# Altium PCB Studio_Clock_hv1.01_PCB_240215a.PcbDoc (part 5 of 5)
Units mm, origin at the board's own origin, x right, y up, seen from the top; angles counter-clockwise.
Board outline 360 x 60 mm, 4 copper layers (TOP, PWR, GND, BOTTOM), stack 0.547 mm thick; 257 components, 289 nets, 969 pads, 664 vias.
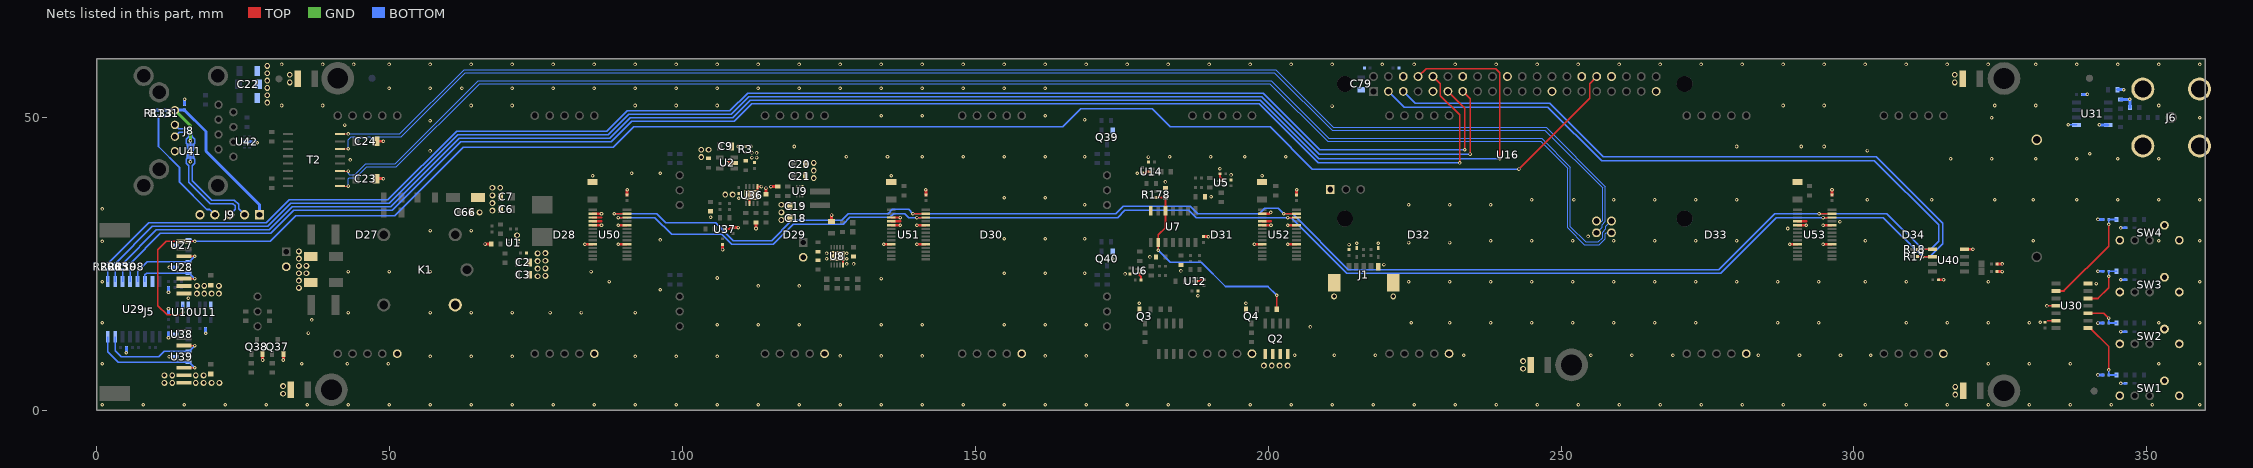
[diagram p5: the nets of this part, all layers, seen from the top]

## Via types
v1: diameter 0.6, hole 0.3, TOP to BOTTOM, 539 vias
v2: diameter 1, hole 0.6, TOP to BOTTOM, 125 vias

## Nets (pads, with @x,y where several pads share a name; then routed paths per layer and width w, separated by ;. In a path a pad name is that pad's centre, name@x,y a point inside that pad or via, vN(x,y) a via of type N, cw(c..) or ccw(c..) an arc to the next point about the centre after c; other vN are vias at no path point) (continued)
PWM_RED: R41.2 R77.2 R178.1 U7.5 U7.9 | length 37
  TOP w0.3: R178.1@180.85,36.35 R77.2@182.45,36.35 182.48,36.32 U7.5@182.48,34.075 182.48,31.23 181.21,29.96 U7.9@181.21,28.625 181.225,28.61 v1(181.225,27.35) ; R41.2@201.45,17.25 v1(201.45,19.65)
  BOTTOM w0.3: v1(181.225,27.35) 183.3,25.275 188.575,25.275 192.7,21.15 199.95,21.15 v1(201.45,19.65)
RED_CTRL_IN: J5.1 U10.2 U16.32 U27.1 | length 284.8
  TOP w0.25: v1(14.7,16.75) 14.3,16.35 12,16.35 10.45,17.9 10.45,27.45 11.85,28.85 J5.1@14.9,28.85 v1(16.75,28.85) ; v1(242.8,41.2) 254.85,53.25 254.85,55.78 U16.32@256.07,57
  BOTTOM w0.25: v1(14.7,16.75) U10.2@14.7,18 ; U27.1@15.75,29.15 16.05,29.15 16.35,28.85 v1(16.75,28.85) 29.65,28.85 34.007,33.207 50.857,33.207 62.557,44.907 88.207,44.907 91.7,48.4 164.95,48.4 168.007,51.457 180.193,51.457 183.243,48.407 200.319,48.407 207.527,41.2 v1(242.8,41.2)
RED_SEL: D27.1 D28.1 D29.1 D30.1 D31.1 D32.1 D33.1 D34.1 Q2.5 Q2.6 Q2.7 Q2.8
  other v2: 199.25,7.65 200.6,7.65 201.95,7.65 203.3,7.65
RS232_RX_IN: J5.3 U28.1 U29.13 | length 14.4
  TOP w0.25: J5.3@14.9,26.31 v1(16.75,26.31)
  BOTTOM w0.25: U29.13@6.96,22 6.96,23.71 8.6,25.35 U28.1@15.65,25.35 15.79,25.35 v1(16.75,26.31)
RS232_RX_OUT: J5.14 U29.8 U39.2 | length 20.4
  TOP w0.25: J5.14@14.9,7.26 v1(16.75,7.26)
  BOTTOM w0.25: U29.8@1.88,12.55 1.88,10.02 3.7,8.2 U39.2@15.65,8.2 15.81,8.2 v1(16.75,7.26)
RS232_TX_IN: J5.6 U28.2 U29.14 | length 12.1
  TOP w0.25: J5.6@14.9,22.5 v1(16.75,22.5)
  BOTTOM w0.25: U29.14@8.23,22 8.23,23.18 8.5,23.45 U28.2@15.65,23.45 15.8,23.45 v1(16.75,22.5)
RS232_TX_OUT: J5.11 U29.7 U39.1 | length 19
  TOP w0.25: J5.11@14.9,11.07 v1(16.75,11.07)
  BOTTOM w0.25: U29.7@3.15,12.55 3.15,10.2 4.2,9.15 10.55,9.15 11.5,10.1 U39.1@15.65,10.1 15.78,10.1 v1(16.75,11.07)
RX_DN_DNP: 
RX_DP_DNP: 
RX_N: T2.8 U16.46 | length 237.3
  TOP w0.2: T2.8@41.558,47.195 42.945,47.195 v1(42.95,47.2)
  BOTTOM w0.2: v1(42.95,47.2) 51.75,47.2 62.7,58.15 201.25,58.15 211.1,48.3 247.457,48.3 257.575,38.182 257.575,32.268 256.985,31.678 256.985,31.265 U16.46@256.05,30.33
RX_P: T2.6 U16.44 | length 237.3
  TOP w0.2: T2.6@41.558,44.655 42.945,44.655 v1(42.95,44.65)
  BOTTOM w0.2: v1(42.95,44.65) 42.95,46.2 43.45,46.7 44.05,46.7 44.35,46.4 44.7,46.4 45,46.7 45.35,46.7 45.65,46.4 46,46.4 46.3,46.7 46.65,46.7 46.95,46.4 47.3,46.4 47.6,46.7 51.957,46.7 62.907,57.65 201.043,57.65 210.893,47.8 247.25,47.8 257.075,37.975 257.075,32.475 256.93,32.33 U16.44@256.05,32.33
SCL_RTC: R17.1 U16.5 U40.6 U50.26 U51.26 U52.26 U53.26 | length 356.6
  TOP w0.25: v1(89.026,32.925) U50.26@90.538,32.925 ; v1(140.026,32.925) U51.26@141.538,32.925 ; v1(203.326,32.925) U52.26@204.838,32.925 ; v1(294.726,32.925) U53.26@296.238,32.925 ; R17.1@310.85,26.25 v1(311.7,26.25) 311.715,26.235 U40.6@313.438,26.235
  BOTTOM w0.25: v1(89.026,32.925) 95.306,32.925 98.131,30.1 106.681,30.1 108.431,28.35 115.495,28.35 118.945,31.8 127.445,31.8 128.595,32.95 135.4,32.95 136.05,33.6 137.95,33.6 138.625,32.925 v1(140.026,32.925) 174.306,32.925 175.531,34.15 186.445,34.15 187.67,32.925 v1(203.326,32.925) 203.894,32.925 213.419,23.4 277.219,23.4 286.744,32.925 v1(294.726,32.925) 305.025,32.925 v1(311.7,26.25) 312.95,26.25 315.15,28.45 315.15,31.94 303.79,43.3 257.19,43.3 248.04,52.45 225.06,52.45 U16.5@223.05,54.46
SDA_RTC: R18.1 U16.3 U40.5 U50.27 U51.27 U52.27 U53.27 | length 360.8
  TOP w0.25: v1(88.35,33.575) U50.27@90.538,33.575 ; v1(139.35,33.575) U51.27@141.538,33.575 ; v1(202.65,33.575) U52.27@204.838,33.575 ; v1(294.05,33.575) U53.27@296.238,33.575 ; R18.1@310.85,27.5 v1(311.7,27.5) 311.705,27.505 U40.5@313.438,27.505
  BOTTOM w0.25: v1(88.35,33.575) 95.575,33.575 97.15,32 105.7,32 108.7,29 115.226,29 118.676,32.45 127.176,32.45 128.326,33.6 135.1,33.6 135.8,34.3 138.625,34.3 v1(139.35,33.575) 174.001,33.575 175.251,34.825 186.725,34.825 187.95,33.6 198.5,33.6 199.4,34.5 201.725,34.5 v1(202.65,33.575) 204.163,33.575 213.688,24.05 276.95,24.05 286.475,33.575 v1(294.05,33.575) 305.625,33.575 v1(311.7,27.5) 313.1,27.5 314.45,28.85 314.45,31.65 303.5,42.6 256.9,42.6 247.75,51.75 223.22,51.75 U16.3@220.51,54.46
SGND: B1.1 C2.1 C3.1 C4.2 C6.1 C7.1 C8.1 C9.1 C10.2 C11.2 C12.1 C13.1 C14.1 C15.1 C16.1 C17.1 C18.1 C19.1 C20.1 C21.1 C22.2 C23.1 C24.1 C25.1 C26.1 C27.1 C28.1 C29.1 C30.1 C31.1 C32.1 C33.1 C64.1 C65.2 C66.1 C67.2 C68.1 C69.1 C72.1 C73.1 C74.1 C75.1 C76.1 C77.1 C78.2 C79.1 C80.2 C81.2 C84.1 C85.1 C93.2 C94.2 C95.1 C96.1 C97.1 D9.2 D10.2 D11.2 D12.2 D20.1 D21.1 D22.2 D23.2 D24.2 D25.2 D26.2 J1.5 J1.6 J1.7 J2.2 J5.7 J5.8 J5.15 J5.16 J6.2 J8.A4 J9.5 J11.2 K1.5 Q3.2 Q4.2 Q37.2 Q38.2 Q39.2 Q40.2 R2.1 R3.1 R6.1 R7.2 R8.2 R21.1 R45.1 R51.1 R61.2 R62.1 R63.2 R71.1 R77.1 R92.1 R93.1 R94.1 R95.1 R96.1 R133.1 R156.2 R157.2 R161.1 R187.1 R189.1 R191.1 R199.1 R201.2 SW1.0 SW1.1 SW2.0 SW2.1 SW3.0 SW3.1 SW4.0 SW4.1 U1.3 U2.2 U5.2 U6.2 U7.7 U8.5 U8.11 U9.4 U10.3 U11.3 U12.2 U14.2 U16.6 U16.9 U16.14 U16.20 U16.25 U16.30 U16.34 U16.39 U16.41 U27.3 U28.3 U29.15 U30.7 U30.11 U30.13 U31.4 U31.5 U36.2 U36.5 U36.9 U37.2 U38.3 U39.3 U40.4 U41.2 U42.3 U42.8 U50.2 U50.3 U50.4 U50.5 U50.10 U50.19 U50.24 U51.3 U51.4 U51.5 U51.10 U51.19 U51.24 U52.2 U52.4 U52.5 U52.10 U52.19 U52.24 U53.4 U53.5 U53.10 U53.19 U53.24 | length 95.7
  TOP w0.25: v1(332.95,17.84) 332.96,17.85 U30.11@334.475,17.85 ; 332.96,15.31 U30.13@334.475,15.31
  TOP w0.3: v1(127.2,25.9) 127.4,25.7 U8.5@127.4,24.85
  TOP w0.35: U37.2@107.537,30.95 107.95,30.95 108.2,31.2 C84.1@108.65,31.2 ; U36.2@111.475,35.3 111.475,36.425 v1(111.8,36.75) ; v1(112.65,37.2) 112.775,37.325 U36.5@112.775,38.2 v1(113.475,38.2) ; U6.2@178.05,23.463 178.05,23.05 178.3,22.8 C14.1@178.3,22.25 ; C29.1@178.5,40.5 179.05,40.5 179.3,40.75 U14.2@179.713,40.75 ; U12.2@187.837,22.05 188.25,22.05 188.5,22.3 C25.1@189.05,22.3 ; C12.1@191.75,40.4 191.75,39.85 192,39.6 U5.2@192,39.187
  TOP w0.4: v1(83.35,28.375) U50.10@84.662,28.375 ; U50.5@84.662,31.625 v1(86.174,31.625) ; U50.4@84.662,32.275 86.174,32.275 ; U50.3@84.662,32.925 86.174,32.925 ; U50.2@84.662,33.575 v1(86.174,33.575) ; v1(89.026,28.375) U50.19@90.538,28.375 ; v1(89.026,31.625) U50.24@90.538,31.625 ; v1(134.35,28.375) U51.10@135.662,28.375 ; U51.5@135.662,31.625 v1(137.174,31.625) ; U51.4@135.662,32.275 137.174,32.275 ; U51.3@135.662,32.925 v1(137.174,32.925) ; v1(140.026,28.375) U51.19@141.538,28.375 ; v1(140.026,31.625) U51.24@141.538,31.625 ; v1(197.65,28.375) U52.10@198.962,28.375 ; U52.5@198.962,31.625 v1(200.474,31.625) ; U52.4@198.962,32.275 200.474,32.275 ; U52.2@198.962,33.575 200.225,33.575 v1(200.45,33.8) ; v1(203.326,28.375) U52.19@204.838,28.375 ; v1(203.326,31.625) U52.24@204.838,31.625 ; v1(289.05,28.375) U53.10@290.362,28.375 ; U53.5@290.362,31.625 v1(291.874,31.625) ; U53.4@290.362,32.275 291.874,32.275 ; v1(294.726,28.375) U53.19@296.238,28.375 ; v1(294.726,31.625) U53.24@296.238,31.625
  TOP w0.5: v1(28.3,8.6) Q38.2@28.3,9.65 ; v1(31.85,8.6) Q37.2@31.85,9.65 ; C23.1@47.65,39.55 v1(48.95,39.55) ; C24.1@47.65,45.95 v1(48.95,45.95) ; v1(66.3,28.4) R2.1@67.35,28.4 ; C65.2@90.55,36.8 v1(90.55,37.65) ; v1(106.85,27.45) C85.1@106.85,28.3 ; C84.1@108.65,31.2 v1(109.5,31.2) ; v1(112.55,31.05) R157.2@112.55,32.1 ; R156.2@114.25,36.9 v1(114.25,37.95) ; v1(115.1,38.2) R63.2@116.25,38.2 ; R62.1@125.45,32.25 v1(125.45,33.35) ; C78.2@141.55,36.8 v1(141.55,37.65) ; C64.1@188.95,29.65 v1(189.8,29.65) ; C80.2@204.85,36.8 v1(204.85,37.65) ; C81.2@296.25,36.8 v1(296.25,37.65) ; C28.1@314.45,22.3 v1(315.3,22.3) ; U40.4@318.862,27.505 320.295,27.505 v1(320.3,27.5) ; C31.1@324.45,23.7 v1(325.3,23.7) ; C32.1@324.45,25 v1(325.3,25)
  TOP w0.6: v1(107.6,42.25) U2.2@108.85,42.25
  BOTTOM w0.3: v1(16,42.45) U41.2@16,43.445 ; v1(336.6,48.75) 336.605,48.745 U31.5@338,48.745
  BOTTOM w0.4: U42.3@25.233,45.85 U42.8@26.067,45.85 27.25,45.85 v1(27.4,45.7) ; v1(345.55,4.6) D9.2@346.4,4.6 ; v1(345.55,13.45) D10.2@346.4,13.45 ; v1(345.55,22.3) D11.2@346.4,22.3 ; v1(345.55,31.15) D12.2@346.4,31.15
  BOTTOM w0.5: v1(5.05,9.85) C69.1@5.05,10.7 ; v1(9.7,51.25) R133.1@10.55,51.25 ; v1(12.25,12.4) C68.1@12.25,13.25 ; C10.2@12.25,16.5 v1(12.25,17.35) ; v1(12.25,20.15) C67.2@12.25,21 ; v1(12.4,24.4) U28.3@13.45,24.4 ; C95.1@15,52.25 v1(15,53.1) ; v1(18.6,13.15) C11.2@18.6,14 ; C77.1@339,53.95 v1(339.85,53.95) ; v1(341.65,6.05) C72.1@342.5,6.05 ; v1(341.65,14.9) C73.1@342.5,14.9 ; v1(341.65,23.75) C74.1@342.5,23.75 ; v1(341.65,32.6) C75.1@342.5,32.6 ; v1(341.9,48.75) 341.905,48.745 U31.4@343.4,48.745 ; R201.2@345,54.75 v1(346.05,54.75) ; R199.1@345.5,53.1 v1(347.1,53.1) R6.1@347.1,51.7
  other v1: 0.95,0.95 7.95,0.95 14.95,0.95 21.95,0.95 28.95,0.95 35.95,0.95 42.95,0.95 49.95,0.95 56.95,0.95 63.95,0.95 70.95,0.95 77.95,0.95 84.95,0.95 91.95,0.95 98.95,0.95 105.95,0.95 112.95,0.95 119.95,0.95 126.95,0.95 133.95,0.95 140.95,0.95 147.95,0.95 154.95,0.95 161.95,0.95 168.95,0.95 175.95,0.95 182.95,0.95 189.95,0.95 196.95,0.95 203.95,0.95 210.95,0.95 217.95,0.95 224.95,0.95 231.95,0.95 238.95,0.95 245.95,0.95 252.95,0.95 259.95,0.95 266.95,0.95 273.95,0.95 280.95,0.95 287.95,0.95 294.95,0.95 301.95,0.95 308.95,0.95 315.95,0.95 322.95,0.95 329.95,0.95 336.95,0.95 343.95,0.95 350.95,0.95 359.05,0.95 0.95,7.95 35,7.95 42.8,7.95 49.8,7.95 322.95,7.95 329.95,7.95 336.95,7.95 352.05,7.95 359.05,7.95 12.35,9.15 56.95,9.2 63.95,9.2 70.95,9.2 91.95,9.2 98.95,9.2 105.95,9.2 126.95,9.3 133.95,9.3 140.95,9.3 161.95,9.3 168.95,9.3 204.5,9.4 211.3,9.4 218.3,9.4 233.4,9.4 255.1,9.4 262.1,9.4 269.1,9.4 283.7,9.4 290.7,9.4 297.7,9.4 302.85,9.4 36.15,13.2 207.2,14.25 105.95,14.6 112.95,14.6 119.95,14.6 133.95,14.6 140.95,14.6 154.95,14.6 161.95,14.6 168.95,14.6 0.95,14.95 224.4,14.95 230.95,14.95 237.95,14.95 244.95,14.95 251.95,14.95 258.95,14.95 265.95,14.95 272.95,14.95 286.95,14.95 293.95,14.95 308.95,14.95 315.95,14.95 322.95,14.95 329.95,14.95 352.05,14.95 359.05,14.95 331.8,15.05 36.7,15.45 42.95,16.7 56.95,16.7 63.95,16.7 70.95,16.7 77.4,16.7 82.75,16.7 91.95,16.7 178,18.3 196.2,18.3 15.65,19.15 188,19.55 96.2,20.6 112.95,21.25 119.95,21.25 341.35,21.65 0.95,21.95 223.95,21.95 230.95,21.95 237.95,21.95 244.95,21.95 251.95,21.95 258.95,21.95 265.95,21.95 272.95,21.95 279.95,21.95 286.95,21.95 293.95,21.95 301.95,21.95 308.95,21.95 322.95,21.95 359.05,21.95 87.5,22 133.95,22.5 105.95,22.6 175.55,23.3 154.95,23.4 161.95,23.4 168.65,23.4 42.95,23.7 49.95,23.7 56.95,23.7 84.4,23.7 185.1,23.8 219.75,24.9 128.05,25 129.2,25 124.6,25.9 125.6,25.9 128.05,25.9 173.45,25.9 179.8,26.2 126.4,26.35 124.6,26.8 125.6,26.8 127.2,26.8 128.05,26.8 12.85,28.2 213.8,28.3 215.1,28.55 218.8,28.55 223.95,28.65 230.95,28.65 0.95,28.85 237.95,28.95 244.95,28.95 251.95,28.95 258.95,28.95 265.95,28.95 272.95,28.95 279.95,28.95 301.95,28.95 330.6,28.95 352.05,28.95 359.05,28.95 96.2,29.1 154.95,29.3 161.95,29.3 168.65,29.3 254.6,29.7 56.95,30.7 63.95,30.7 288.7,31.05 297.6,32.2 104.8,32.95 0.95,34.4 168.65,35.1 223.95,35.1 230.95,35.1 237.95,35.1 244.95,35.95 252.2,35.95 258.95,35.95 265.95,35.95 272.95,35.95 279.95,35.95 302.3,35.95 313.25,35.95 324.05,35.95 330.6,35.95 338.05,35.95 345.05,35.95 352.05,35.95 359.05,35.95 109.6,36.2 110.95,36.3 112.65,36.3 154.95,36.3 161.95,36.3 190.25,36.45 110.95,37.2 182.45,39 84.65,40.05 135.65,40.05 198.95,40.05 193.65,40.2 91.3,40.5 96.2,40.5 177.65,40.5 191.75,41.25 43.3,42.75 316.5,42.95 323.5,42.95 331.05,42.95 338.05,42.95 345.05,42.95 352.05,42.95 111.85,43.15 112.65,43.15 179.55,43.25 128,43.3 135,43.3 140.95,43.3 147.95,43.3 154.95,43.3 161.95,43.3 168.65,43.3 183.15,43.3 190.15,43.3 196,43.3 203,43.3 340.25,43.8 111.85,43.95 112.65,43.95 56.9,44.3 302.3,44.35 109.55,45.05 111.65,45.05 119.1,45.05 279.95,45.05 291,45.05 294.9,45.05 173.45,46.6 42.35,48.7 56.9,49.45 168.65,49.6 323.5,49.95 359.05,49.95 133.95,50.3 140.95,50.3 161.95,50.3 210.9,51.95 31.55,52.05 38.55,52.05 63.9,52.05 70.9,52.05 91.9,52.05 98.9,52.05 105.9,52.05 287.9,52.05 294.9,52.05 324.05,52.05 331.05,52.05 352.05,52.05 49.9,55 56.9,55 62.35,55 70.9,55 77.9,55 84.9,55 91.9,55 98.9,55 105.9,55 112.9,55 119.9,55 126.9,55 133.9,55 140.9,55 147.9,55 154.9,55 161.9,55 31.55,59.05 38.55,59.05 43.85,59.05 49.9,59.05 56.9,59.05 63.9,59.05 70.9,59.05 77.9,59.05 84.9,59.05 91.9,59.05 98.9,59.05 105.9,59.05 112.9,59.05 119.9,59.05 126.9,59.05 133.9,59.05 140.9,59.05 147.9,59.05 154.9,59.05 161.9,59.05 168.9,59.05 175.9,59.05 182.9,59.05 189.9,59.05 196.9,59.05 203.9,59.05 210.9,59.05 219.45,59.05 224.9,59.05 231.9,59.05 238.9,59.05 245.9,59.05 252.9,59.05 259.9,59.05 266.9,59.05 273.9,59.05 280.9,59.05 287.9,59.05 294.9,59.05 301.9,59.05 308.9,59.05 315.9,59.05 322.9,59.05 331.05,59.05 338.05,59.05 345.05,59.05 352.05,59.05 359.05,59.05
  other v2: 317.3,2.7 31.8,2.85 317.3,4 31.8,4.15 11.55,4.7 12.9,4.7 16.9,4.7 18.25,4.7 19.6,4.7 20.95,4.7 11.55,5.97 12.9,5.97 16.9,5.97 18.25,5.97 243.5,7.1 243.5,8.4 211.25,19.45 221.35,19.45 17.1,19.95 18.35,19.95 19.6,19.95 20.85,19.95 34.5,20.9 17.1,21.25 18.35,21.25 20.85,21.25 34.5,22.15 75.25,22.9 76.6,22.95 34.5,23.4 35.8,23.4 75.25,24.2 76.6,24.25 34.5,24.65 35.8,24.65 75.25,25.5 76.6,25.55 34.5,25.9 75.25,26.8 76.6,26.85 34.5,27.15 71.75,29.9 116.9,32.5 65.35,33.8 116.9,33.8 67.55,34.1 116.9,35.1 67.55,35.4 67.55,36.7 107.3,36.85 108.55,36.85 67.55,38 68.9,38 122.4,39.65 122.4,40.95 122.4,42.25 103.2,43.25 103.2,44.5 104.45,44.5 29.1,52.55 29.1,53.8 29.1,55.05 32.95,56 317.2,56 29.1,56.3 32.95,57.3 317.2,57.3 29.1,57.55 29.1,58.8
SS: 
SW0: C72.2 R139.2 U30.1 | length 11
  TOP w0.3: U30.1@339.925,14.04 340.36,14.04 343.5,10.9 v1(343.5,6.9)
  BOTTOM w0.3: v1(343.5,6.9) C72.2@343.5,6.05 R139.2@344.8,6.05
SW1: C73.2 R140.2 U30.3 | length 6.1
  TOP w0.3: U30.3@339.925,16.58 342.67,16.58 v1(343.5,15.75)
  BOTTOM w0.3: v1(343.5,15.75) C73.2@343.5,14.9 R140.2@344.8,14.9
SW2: C74.2 R141.2 U30.5 | length 8.4
  TOP w0.3: U30.5@339.925,19.12 341.67,19.12 343.5,20.95 v1(343.5,22.9)
  BOTTOM w0.3: v1(343.5,22.9) C74.2@343.5,23.75 R141.2@344.8,23.75
SW3: C75.2 R142.2 U30.9 | length 18
  TOP w0.3: U30.9@334.475,20.39 335.84,20.39 343.5,28.05 v1(343.5,31.75)
  BOTTOM w0.3: v1(343.5,31.75) C75.2@343.5,32.6 R142.2@344.8,32.6
SYNC: 
TX_DN_DNP: 
TX_DP_DNP: 
TX_N: T2.3 U16.45 | length 243.8
  TOP w0.2: T2.3@41.558,40.845 42.945,40.845 v1(42.95,40.85)
  BOTTOM w0.2: v1(42.95,40.85) 42.95,40.45 43.15,40.25 44.05,40.25 45.9,42.1 50.963,42.1 65.163,56.3 200.484,56.3 210.334,46.45 246.691,46.45 251.6,41.541 251.6,31.35 254.2,28.75 256.343,28.75 257.075,29.482 257.075,30.392 257.665,30.982 257.665,31.395 U16.45@258.6,32.33
TX_P: T2.1 U16.47 | length 243.8
  TOP w0.2: T2.1@41.558,38.305 42.945,38.305 v1(42.95,38.3)
  BOTTOM w0.2: v1(42.95,38.3) 42.95,39.55 43.15,39.75 44.257,39.75 46.107,41.6 51.17,41.6 65.37,55.8 200.277,55.8 210.127,45.95 246.484,45.95 251.1,41.334 251.1,31.143 253.993,28.25 256.55,28.25 257.575,29.275 257.575,30.185 257.72,30.33 U16.47@258.6,30.33
UART1_RX_IN: R198.2 U16.10 | length 259.1
  TOP w0.25: U16.10@228.13,57 229.4,55.73 229.4,53.75 232.7,50.45 v1(232.7,42.25)
  BOTTOM w0.25: R198.2@5.7,25.05 10.85,30.2 29.696,30.2 33.646,34.15 50.467,34.15 62.167,45.85 87.817,45.85 91.309,49.343 108.843,49.343 111.85,52.35 198.427,52.35 208.527,42.25 v1(232.7,42.25)
UART1_RX_IN_1: R198.1 U29.12 | length 2.1
  BOTTOM w0.25: U29.12@5.69,22 5.69,24.04 R198.1@5.7,24.05
UART1_TX_IN: R130.1 U16.8 | length 280.2
  TOP w0.25: U16.8@225.59,57 226.94,58.35 238.85,58.35 239.55,57.65 v1(239.55,43)
  BOTTOM w0.25: R130.1@4.45,25.05 10.2,30.8 29.447,30.8 33.397,34.75 50.218,34.75 61.918,46.45 87.568,46.45 91.061,49.943 108.594,49.943 111.601,52.95 198.675,52.95 208.625,43 v1(239.55,43)
UART1_TX_IN_1: R130.2 U29.11 | length 2.1
  BOTTOM w0.25: U29.11@4.42,22 4.42,24.02 R130.2@4.45,24.05
UART2_RX_OUT: R206.2 U16.11 | length 258.9
  TOP w0.25: U16.11@230.67,54.46 233.55,51.58 v1(233.55,44.5)
  BOTTOM w0.25: R206.2@1.9,25.05 8.85,32 28.95,32 32.9,35.95 49.721,35.95 61.421,47.65 87.071,47.65 90.564,51.143 108.097,51.143 111.104,54.15 199.172,54.15 208.822,44.5 v1(233.55,44.5)
UART2_RX_OUT_1: R206.1 U29.9 | length 2.1
  BOTTOM w0.25: U29.9@1.88,22 1.88,24.03 R206.1@1.9,24.05
UART2_TX_OUT: R205.2 U16.13 | length 258.4
  TOP w0.25: U16.13@233.21,54.46 234.45,53.22 v1(234.45,43.75)
  BOTTOM w0.25: R205.2@3.15,25.05 9.5,31.4 29.199,31.4 33.149,35.35 49.969,35.35 61.669,47.05 87.319,47.05 90.812,50.543 108.346,50.543 111.353,53.55 198.924,53.55 208.724,43.75 v1(234.45,43.75)
UART2_TX_OUT_1: R205.1 U29.10 | length 2.1
  BOTTOM w0.25: U29.10@3.15,22 R205.1@3.15,24.05
USB_D_N: J8.A2 J9.2 U41.1 U41.6 | length 24
  BOTTOM w0.25: J8.A2@13.35,48.74 14.04,48.05 15.649,48.05 16.3,47.399 16.3,46.7 16.7,46.3 16.7,45.6 16.5,45.4 U41.6@16.5,45.055 U41.1@16.5,43.445 16.5,43.1 16.7,42.9 16.7,42.2 16.3,41.8 16.3,39.2 19.6,35.9 23.5,35.9 24.25,35.15 24.25,34.39 J9.2@25.24,33.4
USB_D_P: J8.A3 J9.3 U41.3 U41.4 | length 23
  BOTTOM w0.25: J8.A3@13.35,46.74 14.06,47.45 15.4,47.45 15.7,47.15 15.7,46.7 15.3,46.3 15.3,45.6 15.5,45.4 U41.4@15.5,45.055 U41.3@15.5,43.445 15.5,43.1 15.3,42.9 15.3,42.2 15.7,41.8 15.7,38.951 19.351,35.3 23.251,35.3 23.65,34.901 23.65,34.35 J9.3@22.7,33.4
USB_ID: J9.4 R131.1 R133.2 | length 22.2
  BOTTOM w0.3: R131.1@11.65,50.25 R133.2@10.55,50.25 10.55,45.05 14.15,41.45 14.15,38.95 18.8,34.3 19.26,34.3 J9.4@20.16,33.4
USB_PWR: C95.2 J8.A1 J9.1 R131.2 U41.5 | length 33.8
  GND w0.5: J8.A1@13.35,51.24 16,48.59 v1(16,46.05)
  BOTTOM w0.3: U41.5@16,45.055 v1(16,46.05)
  BOTTOM w0.5: R131.2@11.65,51.25 13.34,51.25 J8.A1@13.35,51.24 13.36,51.25 C95.2@15,51.25 18.65,47.6 18.65,44.25 27.78,35.12 J9.1@27.78,33.4
VCC_AUX: 
VCP: 
VOB: 
pads on no net: C2. C3. C6. C7. C9. C18. C19. C20. C21. C22. C23. C24. C66. C79. J5.17 J5.18 R3. R13. R14. R15. R16. R17. R18. R127. R128. R130. R131. R133. R171. R172. R173. R174. R175. R176. R177. R178. R198. R205. R206. SW1.3 SW2.3 SW3.3 SW4.3 T2.4 T2.5 T2.12 T2.13 U10.1 U11.1 U16. U16.1 U16.15 U16.16 U16.17 U16.18 U16.19 U16.21 U16.22 U16.23 U16.27 U16.36 U30.10 U30.12 U31.6 U31.7 U40.7 Z2.1 Z4.1 Z6.1 Z8.1 Z10.1 Z12.1
copper on no net:
  other v1: 290.35,40.05

## Polygon pours and split planes (outlines as drawn)
SGND on PWR "NONET_L02_P-001" (solid, remove dead copper, pour order 12): 0.6,0.6 0.6,34.55 1.2,35.15 22.5,35.15 23.75,36.4 23.75,40.4 22.45,41.7 13.35,41.7 8.4,46.65 8.4,51.8 8.65,52.05 12.45,52.05 14.15,53.75 16.3,53.75 17.15,52.9 19.25,52.9 19.8,53.45 22.15,53.45 24.6,51 24.6,50.35 26,48.95 26.95,48.95 28.75,47.15 28.75,37.25 29.8,36.2 41.85,36.2 41.85,49.3 29.6,49.3 26.5,52.4 26.5,58.95 26.95,59.4 359.4,59.4 359.4,0.6
PGND on PWR "NONET_L02_P-001" (solid, remove dead copper, pour order 8): 25.4,50.75 25.2,50.95 25.2,51.15 22.35,54 19.55,54 19,53.45 17.35,53.45 16.5,54.3 13.9,54.3 12.45,52.85 8.7,52.85 7.9,52.05 7.9,46.4 13.1,41.2 22.2,41.2 23.25,40.15 23.25,36.7 22.2,35.65 1.2,35.65 0.6,36.25 0.6,58.8 1.2,59.4 25.1,59.4 25.55,58.95 25.55,52.45 26.5,51.5 26.5,50.95 26.3,50.75 25.85,50.75
+5V on PWR "NONET_L02_P-001" (solid, remove dead copper, pour order 6): 207.3,57.9 207.85,58.45 221,58.45 221.35,58.1 221.35,56.05 220.95,55.65 217.45,55.65 214.4,52.6 207.85,52.6 207.3,53.15
+5V_IN on PWR "NONET_L02_P-001" (solid, remove dead copper, pour order 5): 103.7,38.95 102.95,39.7 102.95,36.95 104.3,35.6 104.9,35.6 104.05,36.45 104.05,37.15 104.65,37.75 108.8,37.75 109.05,38 109.05,38.7 108.8,38.95
+5V_IN on PWR "NONET_L02_P-001" (solid, remove dead copper, pour order 4): 79.25,43.3 74.45,38.5 70.75,38.5 70.5,38.25 70.5,33.85 70.75,33.6 73.8,33.6 79.25,39.05
+5V_IN on PWR "NONET_L02_P-001" (solid, remove dead copper, pour order 3): 74.4,34.2 81.4,41.2 100.1,41.2 100.75,40.55 100.75,35.3 104.1,31.95 111.1,31.95 111.7,31.35 111.7,23.5 113.3,21.9 123.3,21.9 123.65,22.25 123.65,23.95 123.25,24.35 117.15,24.35 115.8,25.7 115.8,32.95 113.15,35.6 104.9,35.6 103.3,37.2 103.3,41.8 101.05,44.05 80,44.05 72.275,36.325
+3V3 on PWR "NONET_L02_P-001" (solid, remove dead copper, pour order 2): 307.45,44.65 307.45,25.2 320.25,12.4 336.8,12.4 336.8,13.85 336.3,14.35 321.4,14.35 309.65,26.1 309.65,44.65 311.2,46.2 305.9,46.2
+3V3 on PWR "NONET_L02_P-001" (solid, remove dead copper, pour order 1): 106.5,39.7 106.95,40.15 106.95,42.6 108.4,44.05 108.4,45 109.25,45.85 321.75,45.85 337.4,30.2 337.4,25.15 338.2,24.35 339.8,24.35 340.45,25 340.45,42.45 338.95,43.95 329.45,43.95 324.95,48.45 107.25,48.45 105.55,46.75 105.55,44.3 103.95,42.7 103.95,39.95 104.2,39.7 104.75,39.7
+5V on PWR "NONET_L02_P-001" (solid, remove dead copper, pour order 0): 108.25,39.55 108.5,39.3 115.5,39.3 120.15,34.65 146.55,34.65 148.3,32.9 148.3,21.65 146.55,19.9 104.3,19.9 102.25,21.95 98.7,21.95 97.35,20.6 97.35,14.95 98.7,13.6 101,13.6 103.15,15.75 169.65,15.75 171.75,13.65 173.3,13.65 173.6,13.95 206.05,13.95 206.3,14.2 206.3,16 206.05,16.25 181.2,16.25 175,22.45 154.55,22.45 153,24 153,37.15 150.05,40.1 120.05,40.1 117.95,42.2 108.85,42.2 108.25,41.6
SGND on BOTTOM "NONET_L02_P-001" (solid, remove dead copper, pour order 14): 0.6,0.6 0.6,34.55 1.2,35.15 22.5,35.15 23.75,36.4 23.75,40.4 22.45,41.7 13.35,41.7 8.4,46.65 8.4,51.8 8.65,52.05 12.45,52.05 14.15,53.75 16.3,53.75 17.15,52.9 19.25,52.9 19.8,53.45 22.15,53.45 24.6,51 24.6,50.35 26,48.95 26.95,48.95 28.75,47.15 28.75,37.25 29.8,36.2 41.85,36.2 41.85,49.3 29.6,49.3 26.5,52.4 26.5,58.95 26.95,59.4 359.4,59.4 359.4,0.6
PGND on BOTTOM "NONET_L02_P-001" (solid, remove dead copper, pour order 7): 25.2,49.65 25.2,51.15 22.35,54 19.55,54 19,53.45 17.35,53.45 16.5,54.3 13.9,54.3 12.45,52.85 8.7,52.85 7.9,52.05 7.9,46.4 12.4,41.9 12.4,36.65 11.4,35.65 1.2,35.65 0.6,36.25 0.6,58.8 1.2,59.4 25.1,59.4 25.55,58.95 25.55,52.45 26.5,51.5 26.5,49.95 26.2,49.65 26,49.65
SGND on TOP "NONET_L02_P-001" (solid, remove dead copper, pour order 11): 0.6,0.6 0.6,34.55 1.2,35.15 22.5,35.15 23.75,36.4 23.75,40.4 22.45,41.7 13.35,41.7 8.4,46.65 8.4,51.8 8.65,52.05 12.45,52.05 14.15,53.75 16.3,53.75 17.15,52.9 19.25,52.9 19.8,53.45 22.15,53.45 24.6,51 24.6,50.35 26,48.95 26.95,48.95 28.75,47.15 28.75,37.25 29.8,36.2 41.85,36.2 41.85,49.3 29.6,49.3 26.5,52.4 26.5,58.95 26.95,59.4 359.4,59.4 359.4,0.6
PGND on TOP "NONET_L02_P-001" (solid, remove dead copper, pour order 9): 25.4,50.75 25.2,50.95 25.2,51.15 22.35,54 19.55,54 19,53.45 17.35,53.45 16.5,54.3 13.9,54.3 12.45,52.85 8.7,52.85 7.9,52.05 7.9,46.4 13.1,41.2 22.2,41.2 23.25,40.15 23.25,36.7 22.2,35.65 1.2,35.65 0.6,36.25 0.6,58.8 1.2,59.4 25.1,59.4 25.55,58.95 25.55,52.45 26.5,51.5 26.5,50.95 26.3,50.75 25.85,50.75
SGND on GND "NONET_L02_P-001" (solid, remove dead copper, pour order 15): 11.5,34.9 12.95,36.35 12.95,42.15 12.7,42.4 21.75,42.4 22.45,41.7 19.45,41.7 18.15,40.4 18.15,37.65 20.65,35.15 22.5,35.15 22.5,34.9
SGND on GND "NONET_L02_P-001" (solid, remove dead copper, pour order 13): 0.6,0.6 0.6,34.55 2.25,36.2 23,36.2 23.75,36.95 23.75,40.4 22.45,41.7 13.35,41.7 8.4,46.65 8.4,51.8 8.65,52.05 12.45,52.05 14.15,53.75 16.3,53.75 17.15,52.9 19.25,52.9 19.8,53.45 22.15,53.45 24.6,51 24.6,50.35 26,48.95 26.95,48.95 28.75,47.15 28.75,37.25 29.8,36.2 41.85,36.2 41.85,49.3 29.6,49.3 26.5,52.4 26.5,58.95 26.95,59.4 359.4,59.4 359.4,0.6
PGND on GND "NONET_L02_P-001" (solid, remove dead copper, pour order 10): 25.2,49.65 25.2,51.15 22.35,54 19.55,54 19,53.45 17.35,53.45 16.5,54.3 13.9,54.3 12.45,52.85 8.7,52.85 7.9,52.05 7.9,46.4 12.4,41.9 12.4,36.65 11.4,35.65 1.2,35.65 0.6,36.25 0.6,58.8 1.2,59.4 25.1,59.4 25.55,58.95 25.55,52.45 26.5,51.5 26.5,49.95 26.2,49.65 26,49.65

## Keep-outs
Keep-Out Layer:
  the board outline again, w1

## Other copper
TOP:
  rectangle net SGND: 35.75,20.15 37.3,27.55
  rectangle net NetR95_2: 321,1.95 323.85,4.75
  rectangle net NetR93_2: 247.2,6.35 250.05,9.15
  rectangle net NetR94_2: 35.5,2.1 38.35,4.9
  rectangle net NetR96_2: 36.65,55.25 39.5,58.05
  rectangle net NetR92_2: 320.9,55.25 323.75,58.05
  rectangle net NetR59_2: 116.25,36.3 119.65,36.8
  pour cut-out: 320.75,25.9 322.75,25.9 322.75,22.8 320.75,22.8
  pour cut-out: 43.536,8.631 49.189,8.631 49.803,9.245 49.803,10.08 52.964,13.241 48.146,13.241
  pour cut-out: 77.191,8.631 82.844,8.631 83.458,9.245 83.458,10.208 84.95,11.7 79.45,11.7 77.191,9.441
  pour cut-out: 116.496,8.631 122.149,8.631 122.763,9.245 122.763,10.08 126.074,13.391 124.774,14.691 122.294,14.691 116.496,8.893
  pour cut-out: 150.151,8.631 155.507,8.631 155.507,9.293 151.75,13.05 148.95,13.05 148.6,12.7 150.151,11.149
  pour cut-out: 189.462,8.631 194.818,8.631 194.818,18.368 194.85,18.4 194.01,18.4 189.462,13.851
  pour cut-out: 223.117,8.631 228.473,8.631 222.313,14.791 220.259,14.791 219.609,14.141 219.609,13.975 223.117,10.467
  pour cut-out: 273.852,8.631 279.505,8.631 280.119,9.245 280.119,10.08 283.53,13.491 282.23,14.791 279.75,14.791 273.852,8.893
  pour cut-out: 312.863,8.631 312.863,9.542 307.605,14.8 304.35,14.8 304.35,12.95 306.596,10.704 306.596,9.245 307.21,8.631
  pour cut-out: 304.705,49.271 315.7,49.271 316.314,49.885 316.314,50.755 315.7,51.369 314.865,51.369 312.075,54.159 309.593,54.159
  pour cut-out: 282.01,49.271 271.015,49.271 270.401,49.885 270.401,50.755 271.015,51.369 271.85,51.369 274.64,54.159 277.122,54.159
  pour cut-out: 217.25,47.45 219.071,49.271 231.379,49.271 232.3,48.35 232.3,50.45 229.3,53.45 219.5,53.45 217.25,51.2
  pour cut-out: 196.079,49.271 196.8,48.55 196.8,51.58 194.272,54.109 190.2,54.109 187.46,51.369 186.625,51.369 186.011,50.755 186.011,49.885 186.625,49.271
  pour cut-out: 147.349,49.271 158.344,49.271 158.958,49.885 158.958,50.755 158.344,51.369 157.509,51.369 154.769,54.109 152.187,54.109
  pour cut-out: 127.54,49.861 125.279,49.861 124.689,49.271 113.659,49.271 113.045,49.885 113.045,50.755 113.659,51.369 114.494,51.369 117.234,54.109 123.292,54.109
  pour cut-out: 87.44,49.861 85.974,49.861 85.384,49.271 74.354,49.271 73.74,49.885 73.74,50.755 74.354,51.369 75.189,51.369 77.929,54.109 83.192,54.109
  pour cut-out: 42.171,49.271 41.85,48.95 39.6,48.95 39.25,49.3 40.085,50.135 40.085,50.755 40.699,51.369 41.534,51.369 44.274,54.109 50.891,54.109 53.15,51.85 53.15,49.9 52.358,49.9 51.729,49.271
  pour cut-out: 37.3,32.056 39.65,32.056 39.65,15.944 37.3,15.944
  pour cut-out: 8.4,46.65 13.35,41.7 22.45,41.7 23.75,40.4 23.75,36.4 22.5,35.15 28.75,35.15 29.8,36.2 29.8,46.1 22.45,53.45 19.8,53.45 19.25,52.9 17.15,52.9 16.3,53.75 14.15,53.75 12.45,52.05 8.65,52.05 8.4,51.8
  region net +5V: 148.35,39.35 148.85,39.85 153.25,39.85 171.2,57.8 207.95,57.8 208.5,57.25 208.5,54.6 207.95,54.05 204.45,54.05 203.1,55.4 172.75,55.4 154.15,36.8 148.85,36.8 148.35,37.3 148.35,37.75
  region net +5V_IN: 111,37.775 107.075,37.775 106.8,38.05 106.8,38.7 107.05,38.95 110.675,38.95 111,38.625
  region net +3V3: 106.9,41.75 104.05,41.75 103.9,41.6 103.9,40 104.2,39.7 106.7,39.7 107,40 107,41.65
  region net RED_SEL: 203.8,7.4 203.55,7.15 196.68,7.15 196.43,7.4 196.43,10.3 196.68,10.55 203.55,10.55 203.8,10.3
  region net GREEN_SEL: 180.8,7.4 181.05,7.15 187.6,7.15 187.85,7.4 187.85,10.3 187.6,10.55 181.05,10.55 180.8,10.3 180.8,9.55
  region net +5V: 200.45,16 200.7,16.25 206.05,16.25 206.3,16 206.3,13.5 206.05,13.25 200.7,13.25 200.45,13.5
  region net +5V: 182.25,16 182.5,16.25 187.85,16.25 188.1,16 188.1,13.5 187.85,13.25 182.5,13.25 182.25,13.5
  region net NetF3_1: 37.3,28.25 33.55,28.25 33.1,27.8 33.1,26.3 30.95,26.3 30.55,26.7 30.55,29.3 33,31.75 37.3,31.75
  region net +5V_IN: 123.5,24.35 124.425,25.275 126.05,25.275 126.05,23.8 125.1,22.85 125.1,21.9 121.65,21.9 121.4,22.15 121.4,24.1 121.65,24.35
  region net NetC17_2: 119.85,36.8 119.85,27.9 123.8,27.9 124.275,27.425 126.05,27.425 126.05,28.55 125.35,29.25 124.75,29.25 122.65,31.35 122.65,33.45 123.2,34 125.15,34 125.15,35.8 121.65,35.8 120.65,36.8
  region net NetL2_1: 120.15,38.5 120.15,37.9 120.3,37.75 120.9,37.75 121.1,37.95 125.15,37.95 125.15,36.6 121.35,36.6 120.9,37.05 120.1,37.05 119.85,37.3 119.85,38.5
  region net +5V_BP: 119.65,38 117.5,38 117.5,38.75 116.95,39.3 112.8,39.3 112.3,38.8 112.3,37.775 111.95,37.775 111.95,41.45 112.05,41.55 115.8,41.55 116.9,42.65 119.45,42.65 119.65,42.45
  region net SGND: 108.225,42.575 109.65,42.575 110.425,43.35 111.2,43.35 111.35,43.5 111.35,44.1 111.5,44.25 112.8,44.25 112.95,44.1 112.95,42.2 112.8,42.05 110.1,42.05 109.975,41.925 108.225,41.925
  region net +5V: 111.65,37.775 111.65,41.15 111.15,41.65 108.225,41.65 108.225,39.7 108.625,39.3 110.8,39.3 111.3,38.8 111.3,37.775
  region net +5V_IN: 77.85,33.6 70.5,33.6 70.5,38.25 70.75,38.5 77.3,38.5 77.85,37.95
  region net NetC1_1: 71.75,28.75 72.35,28.75 72.85,29.25 72.75,29.35 72.75,31.1 77.85,31.1 77.85,28.1 77.45,27.7 73.1,27.7 72.35,28.45 71.75,28.45
  region net SGND: 72.25,28.95 72.25,30.15 72,30.4 71.5,30.4 71.25,30.15 71.25,29.15 71.45,28.95
  region net +12V: 71.55,28.25 71.4,28.1 71.4,27.05 69.9,25.55 62.2,25.55 61.45,24.8 61.45,23.25 62.2,22.5 72.3,22.5 72.3,25.9 72.6,26.2 72.6,27.9 72.25,28.25
  region net +12V_Ext: 39.65,31.75 39.65,25.4 50.4,25.4 51.2,26.2 51.2,31 50.4,31.8 48.4,31.8 44.95,28.35 42.75,28.35 42.25,28.85 42.25,31.75
  region net NetD20_2: 39.65,16.25 39.65,22.6 50.4,22.6 51.2,21.8 51.2,17 50.4,16.2 48.4,16.2 44.95,19.65 42.75,19.65 42.25,19.15 42.25,16.25
  region net +12V_Q: 37.3,19.75 37.3,16.25 33.7,16.25 33.45,16.5 33.45,19.5 33.7,19.75
  region net +12V_Q: 13.625,10.125 17.565,10.125 18.35,10.91 23.85,10.91 24.1,10.66 24.1,7.66 23.85,7.41 18.3,7.41 17.5,8.21 13.625,8.21
  region net +12V_Q: 13.625,25.375 17.575,25.375 18.35,26.15 23.85,26.15 24.1,25.9 24.1,22.9 23.85,22.65 18.3,22.65 17.5,23.45 13.625,23.45
PWR:
  pour cut-out: 320.75,25.9 322.75,25.9 322.75,22.8 320.75,22.8
  pour cut-out: 8.4,46.65 13.35,41.7 22.45,41.7 23.75,40.4 23.75,36.4 22.5,35.15 28.75,35.15 29.8,36.2 29.8,46.1 22.45,53.45 19.8,53.45 19.25,52.9 17.15,52.9 16.3,53.75 14.15,53.75 12.45,52.05 8.65,52.05 8.4,51.8
  pour cut-out: 213.95,57.7 215.1,56.55 215.1,54.85 214,53.75 212.25,53.75 211.1,54.9 211.1,56.55 212.25,57.7
  region net GREEN_SEL: 221.126,8.65 221.476,9 221.476,10.65 221.976,11.15 218.926,11.15 219.426,10.65 219.426,9 219.776,8.65 220.376,8.65
  region net GREEN_SEL: 271.861,8.65 272.211,9 272.211,10.65 272.711,11.15 269.661,11.15 270.161,10.65 270.161,9 270.511,8.65 271.111,8.65
  region net GREEN_SEL: 148.16,8.65 148.51,9 148.51,10.65 149.01,11.15 145.96,11.15 146.46,10.65 146.46,9 146.81,8.65 147.41,8.65
  region net +12V_Q: 25.05,20.1 26.4,21.45 28.1,21.45 33.3,16.25 35.45,16.25 35.7,16.5 35.7,19.5 35.45,19.75 34.2,19.75 27.8,26.15 22.1,26.15 21.85,25.9 21.85,7.65 22.1,7.4 24.8,7.4 25.05,7.65
  region net GREEN_SEL: 75.2,8.65 75.55,9 75.55,10.65 76.05,11.15 73,11.15 73.5,10.65 73.5,9 73.85,8.65 74.45,8.65
  region net GREEN_SEL: 187.85,10.3 188.55,11 305.9,11 305.9,12.15 304.75,13.3 174.3,13.3 173.85,12.85 171.2,12.85 170.75,13.3 102.05,13.3 101.6,12.85 97.6,12.85 97.15,13.3 41.1,13.3 39.55,11.75 39.55,9.05 39.95,8.65 41.55,8.65 41.95,9.05 41.95,10.35 42.6,11 95.75,11 96.25,10.5 103.15,10.5 103.65,11 168.4,11 172.25,7.15 187.15,7.15 187.85,7.85
  region net RED_SEL: 84.539,10.48 84.189,10.13 84.189,8.48 83.559,7.85 86.869,7.85 86.239,8.48 86.239,10.13 85.889,10.48 85.289,10.48
  region net RED_SEL: 157.499,10.48 157.149,10.13 157.149,8.48 156.519,7.85 159.829,7.85 159.199,8.48 159.199,10.13 158.849,10.48 158.249,10.48
  region net RED_SEL: 230.465,10.48 230.115,10.13 230.115,8.48 229.485,7.85 232.795,7.85 232.165,8.48 232.165,10.13 231.815,10.48 231.215,10.48
  region net RED_SEL: 123.844,10.48 123.494,10.13 123.494,8.48 122.864,7.85 126.174,7.85 125.544,8.48 125.544,10.13 125.194,10.48 124.594,10.48
  region net GREEN_SEL: 305.55,8.65 305.9,9 305.9,11.15 303.316,11.15 303.816,10.65 303.816,9 304.166,8.65 304.766,8.65
  region net RED_SEL: 281.2,10.48 280.85,10.13 280.85,8.48 280.22,7.85 283.53,7.85 282.9,8.48 282.9,10.13 282.55,10.48 281.95,10.48
  region net RED_SEL: 52.85,10.45 53.3,10 53.3,8.4 53.65,8.05 170.25,8.05 171.9,6.4 195.85,6.4 196.4,6.95 196.4,10 196.85,10.45 201.7,10.45 204.1,8.05 238.05,8.05 241.6,4.5 256.4,4.5 259.95,8.05 314.1,8.05 314.45,8.4 314.45,10.1 314.8,10.45 316.4,10.45 316.75,10.1 316.75,7.35 315.1,5.7 261.5,5.7 257.9,2.1 240.1,2.1 238.35,3.85 52.7,3.85 50.5,6.05 50.5,10 50.95,10.45 51.2,10.45
  region net GREEN_SEL: 114.505,8.65 114.855,9 114.855,10.65 115.355,11.15 112.305,11.15 112.805,10.65 112.805,9 113.155,8.65 113.755,8.65
  region net +12V_Q: 35.45,19.75 35.7,19.5 35.7,16.5 35.45,16.25 33.7,16.25 33.45,16.5 33.45,19.5 33.7,19.75
  region net +12V_Q: 23.85,26.15 24.1,25.9 24.1,22.9 23.85,22.65 22.1,22.65 21.85,22.9 21.85,25.9 22.1,26.15
  region net +12V_Q: 23.85,10.91 24.1,10.66 24.1,7.66 23.85,7.41 22.1,7.41 21.85,7.66 21.85,10.66 22.1,10.91
GND:
  pour cut-out: 320.75,25.9 322.75,25.9 322.75,22.8 320.75,22.8
  pour cut-out: 0.6,34.55 1.2,35.15 11.75,35.15 12.95,36.35 12.1,36.35 11.4,35.65 1.2,35.65 0.6,35.05
BOTTOM:
  rectangle net PGND: 25.2,49.65 26.1,51.15
  region net PGND: 24.65,59.15 24.1,59.15 24.1,52.104 24.65,52.104
  rectangle net SGND: 27.15,52 27.7,59.15
  rectangle net SGND: 222.05,57.85 222.419,58.45
  pour cut-out: 8.4,46.65 13.35,41.7 22.45,41.7 23.75,40.4 23.75,36.4 22.5,35.15 28.75,35.15 29.8,36.2 29.8,46.1 22.45,53.45 19.8,53.45 19.25,52.9 17.15,52.9 16.3,53.75 14.15,53.75 12.45,52.05 8.65,52.05 8.4,51.8
  region net +5V: 220.85,56.25 221.3,56.7 221.3,57.45 221.55,57.7 221.55,58.7 220.65,58.7 219.75,57.8 219.75,56.65 220.15,56.25
  region net +5V: 215.25,56.3 215.3,56.25 218.3,56.25 218.75,56.7 218.75,58.25 218.3,58.7 217.15,58.7 217.15,57.8 216.6,57.25 215.25,57.25
  region net +3V3: 106,40.7 106.25,40.45 106.25,39.95 106,39.7 104.2,39.7 103.95,39.95 103.95,40.45 104.2,40.7
  region net +5V: 111.4,40.3 111.65,40.05 111.65,39.55 111.4,39.3 108.5,39.3 108.25,39.55 108.25,40.05 108.5,40.3
  region net +12V_Q: 23.85,10.91 24.1,10.66 24.1,7.66 23.85,7.41 22.1,7.41 21.85,7.66 21.85,10.66 22.1,10.91
  region net +12V_Q: 23.85,26.15 24.1,25.9 24.1,22.9 23.85,22.65 22.1,22.65 21.85,22.9 21.85,25.9 22.1,26.15

## Silkscreen, mask and mechanical layers (free items; w line width, h text height)
Top Overlay:
  lines w0.15: 66.4,32.2 66.4,31.6 67.05,30.95 ; 68.2,32.8 68.55,32.8 68.95,32.4 ; 104.8,32.5 105.7,32.5 ; 107.15,37.55 109.15,37.55 ; 121.1,34.1 121.5,33.7 ; 121.1,38.4 121.3,38.6 122.6,38.6 ; 121.7,23.2 122.7,23.2 122.9,23.4 ; 121.8,40.3 122.6,40.3 ; 176.8,25.4 177.1,25.1 177.1,24.7 177.2,24.6 ; 180.8,41.7 180.9,41.8 181.5,41.8 181.6,41.9 ; 188.3,22.9 188.4,23 189.1,23 189.2,23.1 ; 192.9,38.2 193,38.1 193,37.6 193.2,37.4
  text "Studio_Clock_hv1.01" at 99.3,3.507 h4
Bottom Overlay:
  lines w0.15: 211,57.7 214.7,57.7 215,57.4
DESIGN_OUTLINE:
  the board outline again, w0.1
Drill Drawing:
  lines w0.381: 55.29,67.001 146.351,67.001 ; 55.29,124.151 146.351,124.151 ; 69.283,63.191 69.283,127.961 ; 84.519,63.191 84.519,127.961 ; 113.72,63.191 113.72,127.961 ; 126.569,63.191 126.569,127.961 ; 55.29,63.191 146.351,63.191 146.351,127.961 55.29,127.961 55.29,63.191
  text "Symbol" at 57.576,125.294 h1.83
  text "Count" at 70.426,125.294 h1.83
  text "Hole Size" at 85.662,125.294 h1.83
  text "Plated" at 114.863,125.294 h1.83
  text "Hole Type" at 127.712,125.294 h1.83
  text "539" at 70.426,121.484 h1.52
  text "0.300mm (11.81mil)" at 85.662,121.484 h1.52
  text "PTH" at 114.863,121.484 h1.52
  text "Round" at 127.712,121.484 h1.52
  text "A" at 56.838,121.23 h1.69
  text "125" at 70.426,117.674 h1.52
  text "0.600mm (23.62mil)" at 85.662,117.674 h1.52
  text "PTH" at 114.863,117.674 h1.52
  text "Round" at 127.712,117.674 h1.52
  text "B" at 56.838,117.42 h1.69
  text "8" at 70.426,113.864 h1.52
  text "0.890mm (35.04mil)" at 85.662,113.864 h1.52
  text "PTH" at 114.863,113.864 h1.52
  text "Round" at 127.712,113.864 h1.52
  text "C" at 56.838,113.61 h1.69
  text "24" at 70.426,110.054 h1.52
  text "0.900mm (35.43mil)" at 85.662,110.054 h1.52
  text "PTH" at 114.863,110.054 h1.52
  text "Round" at 127.712,110.054 h1.52
  text "D" at 56.838,109.8 h1.69
  text "15" at 70.426,106.244 h1.52
  text "0.910mm (35.83mil)" at 85.662,106.244 h1.52
  text "PTH" at 114.863,106.244 h1.52
  text "Round" at 127.712,106.244 h1.52
  text "E" at 56.838,105.99 h1.69
  text "4" at 70.426,102.434 h1.52
  text "0.920mm (36.22mil)" at 85.662,102.434 h1.52
  text "PTH" at 114.863,102.434 h1.52
  text "Round" at 127.712,102.434 h1.52
  text "F" at 56.838,102.18 h1.69
  text "80" at 70.426,98.624 h1.52
  text "0.991mm (39.00mil)" at 85.662,98.624 h1.52
  text "PTH" at 114.863,98.624 h1.52
  text "Round" at 127.712,98.624 h1.52
  text "G" at 56.838,98.37 h1.69
  text "52" at 70.426,94.814 h1.52
  text "1.000mm (39.37mil)" at 85.662,94.814 h1.52
  text "PTH" at 114.863,94.814 h1.52
  text "Round" at 127.712,94.814 h1.52
  text "H" at 56.838,94.56 h1.69
  text "2" at 70.426,91.004 h1.52
  text "1.295mm (51.00mil)" at 85.662,91.004 h1.52
  text "PTH" at 114.863,91.004 h1.52
  text "Round" at 127.712,91.004 h1.52
  text "I" at 57.12,90.75 h1.69
  text "1" at 70.426,87.194 h1.52
  text "1.300mm (51.18mil)" at 85.662,87.194 h1.52
  text "PTH" at 114.863,87.194 h1.52
  text "Round" at 127.712,87.194 h1.52
  text "J" at 56.838,86.94 h1.69
  text "5" at 70.426,83.384 h1.52
  text "1.500mm (59.06mil)" at 85.662,83.384 h1.52
  text "PTH" at 114.863,83.384 h1.52
  text "Round" at 127.712,83.384 h1.52
  text "K" at 56.838,83.13 h1.69
  text "6" at 70.426,79.574 h1.52
  text "2.300mm (90.55mil)" at 85.662,79.574 h1.52
  text "PTH" at 114.863,79.574 h1.52
  text "Round" at 127.712,79.574 h1.52
  text "L" at 56.838,79.32 h1.69
  text "4" at 70.426,75.764 h1.52
  text "2.750mm (108.27mil)" at 85.662,75.764 h1.52
  text "NPTH" at 114.863,75.764 h1.52
  text "Round" at 127.712,75.764 h1.52
  text "M" at 56.838,75.51 h1.69
  text "4" at 70.426,71.954 h1.52
  text "2.900mm (114.17mil)" at 85.662,71.954 h1.52
  text "PTH" at 114.863,71.954 h1.52
  text "Round" at 127.712,71.954 h1.52
  text "N" at 56.838,71.7 h1.69
  text "5" at 70.426,68.144 h1.52
  text "3.531mm (139.00mil)" at 85.662,68.144 h1.52
  text "PTH" at 114.863,68.144 h1.52
  text "Round" at 127.712,68.144 h1.52
  text "O" at 56.838,67.89 h1.69
  text "874 Total" at 70.426,64.334 h1.52
DRAWING_ORIGIN:
  lines w0.025: -15.635,0 -14.365,0 ; -15,-0.635 -15,0.635

## Dimensions
0,0 to 41.134,56.68 on Mechanical 2
0,0 to 40.065,3.51 on Mechanical 2
360,0 to 360,60 on Mechanical 2
360,0 to 325.614,56.661 on Mechanical 2
360,0 to 251.79,7.76 on Mechanical 2
325.614,3.36 to 360,0 on Mechanical 2
325.614,3.36 to 360,0 on Mechanical 2
251.79,7.76 to 325.614,3.36 on Mechanical 2
40.065,3.51 to 251.79,7.76 on Mechanical 2
0,0 to 40.065,3.51 on Mechanical 2
0,60 to 360,60 on Mechanical 2
325.614,56.661 to 360,60 on Mechanical 2
41.134,56.68 to 325.614,56.661 on Mechanical 2
0,59 to 41.134,56.68 on Mechanical 2

## Text inside footprints (layer, text, board x,y; h text height)
#001: BODY_CENTER_TOP "MOUNT KIJYUNNTENN" at 8.9,-4.6 h2
D27: PIN_NUMBER "1" at 51.04,9.68 h0.64 r270; PIN_NUMBER "5" at 40.88,9.68 h0.64 r270; PIN_NUMBER "10" at 50.786,50.32 h0.64 r270; PIN_NUMBER "9" at 48.5,50.32 h0.64 r270; PIN_NUMBER "7" at 43.42,50.32 h0.64 r270; PIN_NUMBER "3" at 45.96,9.68 h0.64 r270; PIN_NUMBER "4" at 43.42,9.68 h0.64 r270; PIN_NUMBER "2" at 48.5,9.68 h0.64 r270; PIN_NUMBER "6" at 40.88,50.32 h0.64 r270; PIN_NUMBER "8" at 45.96,50.32 h0.64 r270; Bottom Overlay "*" at 51.079,8.252 h1.27 r270
D28: PIN_NUMBER "1" at 84.695,9.68 h0.64 r270; PIN_NUMBER "5" at 74.535,9.68 h0.64 r270; PIN_NUMBER "10" at 84.441,50.32 h0.64 r270; PIN_NUMBER "9" at 82.155,50.32 h0.64 r270; PIN_NUMBER "7" at 77.075,50.32 h0.64 r270; PIN_NUMBER "3" at 79.615,9.68 h0.64 r270; PIN_NUMBER "4" at 77.075,9.68 h0.64 r270; PIN_NUMBER "2" at 82.155,9.68 h0.64 r270; PIN_NUMBER "6" at 74.535,50.32 h0.64 r270; PIN_NUMBER "8" at 79.615,50.32 h0.64 r270; Bottom Overlay "*" at 84.734,8.252 h1.27 r270
D29: PIN_NUMBER "1" at 124,9.68 h0.64 r270; PIN_NUMBER "5" at 113.84,9.68 h0.64 r270; PIN_NUMBER "10" at 123.746,50.32 h0.64 r270; PIN_NUMBER "9" at 121.46,50.32 h0.64 r270; PIN_NUMBER "7" at 116.38,50.32 h0.64 r270; PIN_NUMBER "3" at 118.92,9.68 h0.64 r270; PIN_NUMBER "4" at 116.38,9.68 h0.64 r270; PIN_NUMBER "2" at 121.46,9.68 h0.64 r270; PIN_NUMBER "6" at 113.84,50.32 h0.64 r270; PIN_NUMBER "8" at 118.92,50.32 h0.64 r270; Bottom Overlay "*" at 124.039,8.252 h1.27 r270
D30: PIN_NUMBER "1" at 157.655,9.68 h0.64 r270; PIN_NUMBER "5" at 147.495,9.68 h0.64 r270; PIN_NUMBER "10" at 157.401,50.32 h0.64 r270; PIN_NUMBER "9" at 155.115,50.32 h0.64 r270; PIN_NUMBER "7" at 150.035,50.32 h0.64 r270; PIN_NUMBER "3" at 152.575,9.68 h0.64 r270; PIN_NUMBER "4" at 150.035,9.68 h0.64 r270; PIN_NUMBER "2" at 155.115,9.68 h0.64 r270; PIN_NUMBER "6" at 147.495,50.32 h0.64 r270; PIN_NUMBER "8" at 152.575,50.32 h0.64 r270; Bottom Overlay "*" at 157.694,8.252 h1.27 r270
D31: PIN_NUMBER "1" at 196.966,9.68 h0.64 r270; PIN_NUMBER "5" at 186.806,9.68 h0.64 r270; PIN_NUMBER "10" at 196.712,50.32 h0.64 r270; PIN_NUMBER "9" at 194.426,50.32 h0.64 r270; PIN_NUMBER "7" at 189.346,50.32 h0.64 r270; PIN_NUMBER "3" at 191.886,9.68 h0.64 r270; PIN_NUMBER "4" at 189.346,9.68 h0.64 r270; PIN_NUMBER "2" at 194.426,9.68 h0.64 r270; PIN_NUMBER "6" at 186.806,50.32 h0.64 r270; PIN_NUMBER "8" at 191.886,50.32 h0.64 r270; Bottom Overlay "*" at 197.005,8.252 h1.27 r270
D32: PIN_NUMBER "1" at 230.621,9.68 h0.64 r270; PIN_NUMBER "5" at 220.461,9.68 h0.64 r270; PIN_NUMBER "10" at 230.367,50.32 h0.64 r270; PIN_NUMBER "9" at 228.081,50.32 h0.64 r270; PIN_NUMBER "7" at 223.001,50.32 h0.64 r270; PIN_NUMBER "3" at 225.541,9.68 h0.64 r270; PIN_NUMBER "4" at 223.001,9.68 h0.64 r270; PIN_NUMBER "2" at 228.081,9.68 h0.64 r270; PIN_NUMBER "6" at 220.461,50.32 h0.64 r270; PIN_NUMBER "8" at 225.541,50.32 h0.64 r270; Bottom Overlay "*" at 230.66,8.252 h1.27 r270
D33: PIN_NUMBER "1" at 281.356,9.68 h0.64 r270; PIN_NUMBER "5" at 271.196,9.68 h0.64 r270; PIN_NUMBER "10" at 281.102,50.32 h0.64 r270; PIN_NUMBER "9" at 278.816,50.32 h0.64 r270; PIN_NUMBER "7" at 273.736,50.32 h0.64 r270; PIN_NUMBER "3" at 276.276,9.68 h0.64 r270; PIN_NUMBER "4" at 273.736,9.68 h0.64 r270; PIN_NUMBER "2" at 278.816,9.68 h0.64 r270; PIN_NUMBER "6" at 271.196,50.32 h0.64 r270; PIN_NUMBER "8" at 276.276,50.32 h0.64 r270; Bottom Overlay "*" at 281.395,8.252 h1.27 r270
D34: PIN_NUMBER "8" at 309.931,50.32 h0.64 r270; PIN_NUMBER "6" at 304.851,50.32 h0.64 r270; PIN_NUMBER "2" at 312.471,9.68 h0.64 r270; PIN_NUMBER "4" at 307.391,9.68 h0.64 r270; PIN_NUMBER "3" at 309.931,9.68 h0.64 r270; PIN_NUMBER "7" at 307.391,50.32 h0.64 r270; PIN_NUMBER "9" at 312.471,50.32 h0.64 r270; PIN_NUMBER "10" at 314.757,50.32 h0.64 r270; PIN_NUMBER "5" at 304.851,9.68 h0.64 r270; PIN_NUMBER "1" at 315.011,9.68 h0.64 r270; Bottom Overlay "*" at 315.05,8.252 h1.27 r270
J6: NCLEGEND-1-4 "PCB Edge" at 360.308,42.5 h1.27 r270
SS1: PIN_NUMBER "1" at 325.206,56.661 h0.51; SYMDIM_TOP "SPACER_139T" at 321.745,63.975 h0.79; SYMDIM_TOP "PAD C220-139T" at 320.664,51.816 h0.79; SYMDIM_TOP "ALL DIMS IN MM." at 320.217,50.334 h0.79; SYMDIM_TOP "4.5" at 331.208,61.869 h0.79
SS2: PIN_NUMBER "1" at 251.382,7.76 h0.51; SYMDIM_TOP "SPACER_139T" at 247.921,15.074 h0.79; SYMDIM_TOP "PAD C220-139T" at 246.84,2.914 h0.79; SYMDIM_TOP "ALL DIMS IN MM." at 246.393,1.433 h0.79; SYMDIM_TOP "4.5" at 257.384,12.968 h0.79
SS3: PIN_NUMBER "1" at 39.657,3.51 h0.51; SYMDIM_TOP "SPACER_139T" at 36.197,10.824 h0.79; SYMDIM_TOP "PAD C220-139T" at 35.115,-1.336 h0.79; SYMDIM_TOP "ALL DIMS IN MM." at 34.668,-2.817 h0.79; SYMDIM_TOP "4.5" at 45.659,8.718 h0.79
SS4: PIN_NUMBER "1" at 325.206,3.36 h0.51; SYMDIM_TOP "4.5" at 331.208,8.567 h0.79; SYMDIM_TOP "ALL DIMS IN MM." at 320.217,-2.967 h0.79; SYMDIM_TOP "PAD C220-139T" at 320.664,-1.486 h0.79; SYMDIM_TOP "SPACER_139T" at 321.745,10.673 h0.79
SS5: PIN_NUMBER "1" at 40.726,56.68 h0.51; SYMDIM_TOP "SPACER_139T" at 37.265,63.994 h0.79; SYMDIM_TOP "PAD C220-139T" at 36.184,51.834 h0.79; SYMDIM_TOP "ALL DIMS IN MM." at 35.737,50.353 h0.79; SYMDIM_TOP "4.5" at 46.728,61.887 h0.79
T2: Top Overlay "*" at 43,37.9 h1.27 r180; NCLEGEND-1-4 "*" at 41.583,37.746 h1.27 r180
U16: PIN_NUMBER "28" at 250.482,57 h0.64; PIN_NUMBER "27" at 250.482,54.46 h0.64; PIN_NUMBER "1" at 217.716,54.46 h0.64; PIN_NUMBER "17" at 237.782,54.46 h0.64; PIN_NUMBER "2" at 217.716,57 h0.64; PIN_NUMBER "41" at 210.892,41.57 h0.64; PIN_NUMBER "9" at 227.876,54.46 h0.64; PIN_NUMBER "6" at 222.796,57 h0.64; PIN_NUMBER "39" at 265.722,54.46 h0.64; PIN_NUMBER "34" at 258.102,57 h0.64; PIN_NUMBER "30" at 253.022,57 h0.64; PIN_NUMBER "25" at 247.942,54.46 h0.64; PIN_NUMBER "20" at 240.322,57 h0.64; PIN_NUMBER "14" at 232.702,57 h0.64; PIN_NUMBER "4" at 220.256,57 h0.64; PIN_NUMBER "42" at 213.312,40.93 h0.64; PIN_NUMBER "43" at 216.232,41.15 h0.64; PIN_NUMBER "8" at 225.336,57 h0.64; PIN_NUMBER "10" at 227.622,57 h0.64; PIN_NUMBER "38" at 263.182,57 h0.64; PIN_NUMBER "40" at 265.722,57 h0.64; PIN_NUMBER "37" at 263.182,54.46 h0.64; PIN_NUMBER "31" at 255.562,54.46 h0.64; PIN_NUMBER "29" at 253.022,54.46 h0.64; PIN_NUMBER "26" at 247.942,57 h0.64; PIN_NUMBER "7" at 225.336,54.46 h0.64; PIN_NUMBER "3" at 220.256,54.46 h0.64; PIN_NUMBER "5" at 222.796,54.46 h0.64; PIN_NUMBER "35" at 260.642,54.46 h0.64; PIN_NUMBER "12" at 230.162,57 h0.64; PIN_NUMBER "21" at 242.862,54.46 h0.64; PIN_NUMBER "23" at 245.402,54.46 h0.64; PIN_NUMBER "24" at 245.402,57 h0.64; PIN_NUMBER "36" at 260.642,57 h0.64; PIN_NUMBER "16" at 235.242,57 h0.64; PIN_NUMBER "18" at 237.782,57 h0.64; PIN_NUMBER "22" at 242.862,57 h0.64; PIN_NUMBER "15" at 235.242,54.46 h0.64; PIN_NUMBER "11" at 230.162,54.46 h0.64; PIN_NUMBER "13" at 232.702,54.46 h0.64; PIN_NUMBER "32" at 255.562,57 h0.64; PIN_NUMBER "33" at 258.102,54.46 h0.64; PIN_NUMBER "44" at 255.412,34.03 h0.64; PIN_NUMBER "46" at 253.572,30.19 h0.64; PIN_NUMBER "47" at 260.552,30.51 h0.64; PIN_NUMBER "45" at 258.132,33.89 h0.64; PIN_NUMBER "19" at 240.322,54.46 h0.64